# Altium PCB PCB_esp32_c3.PcbDoc
Units mm, origin at the board's own origin, x right, y up, seen from the top; angles counter-clockwise.
Board outline 73.79 x 53.97 mm, 2 copper layers (Top Layer, Bottom Layer); 50 components, 32 nets, 197 pads, 491 vias.
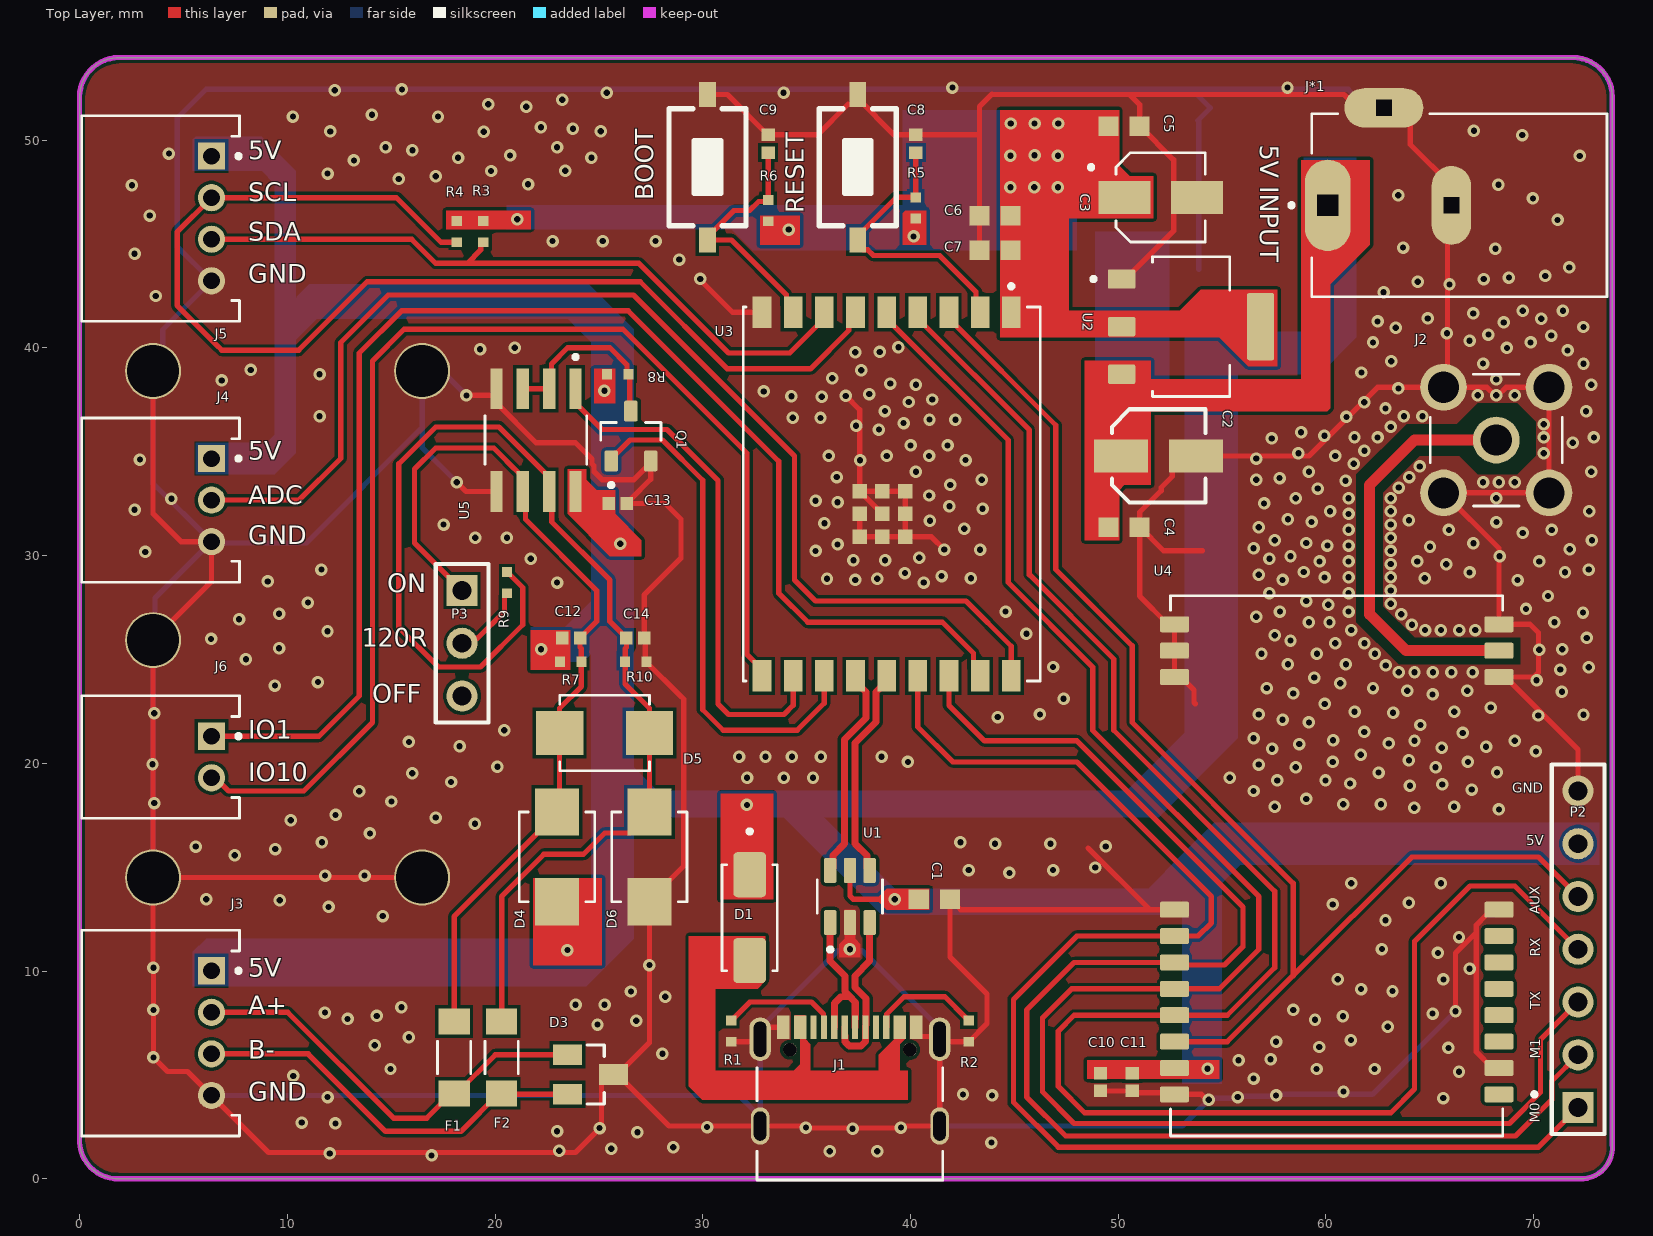
[diagram p0: Top Layer view]
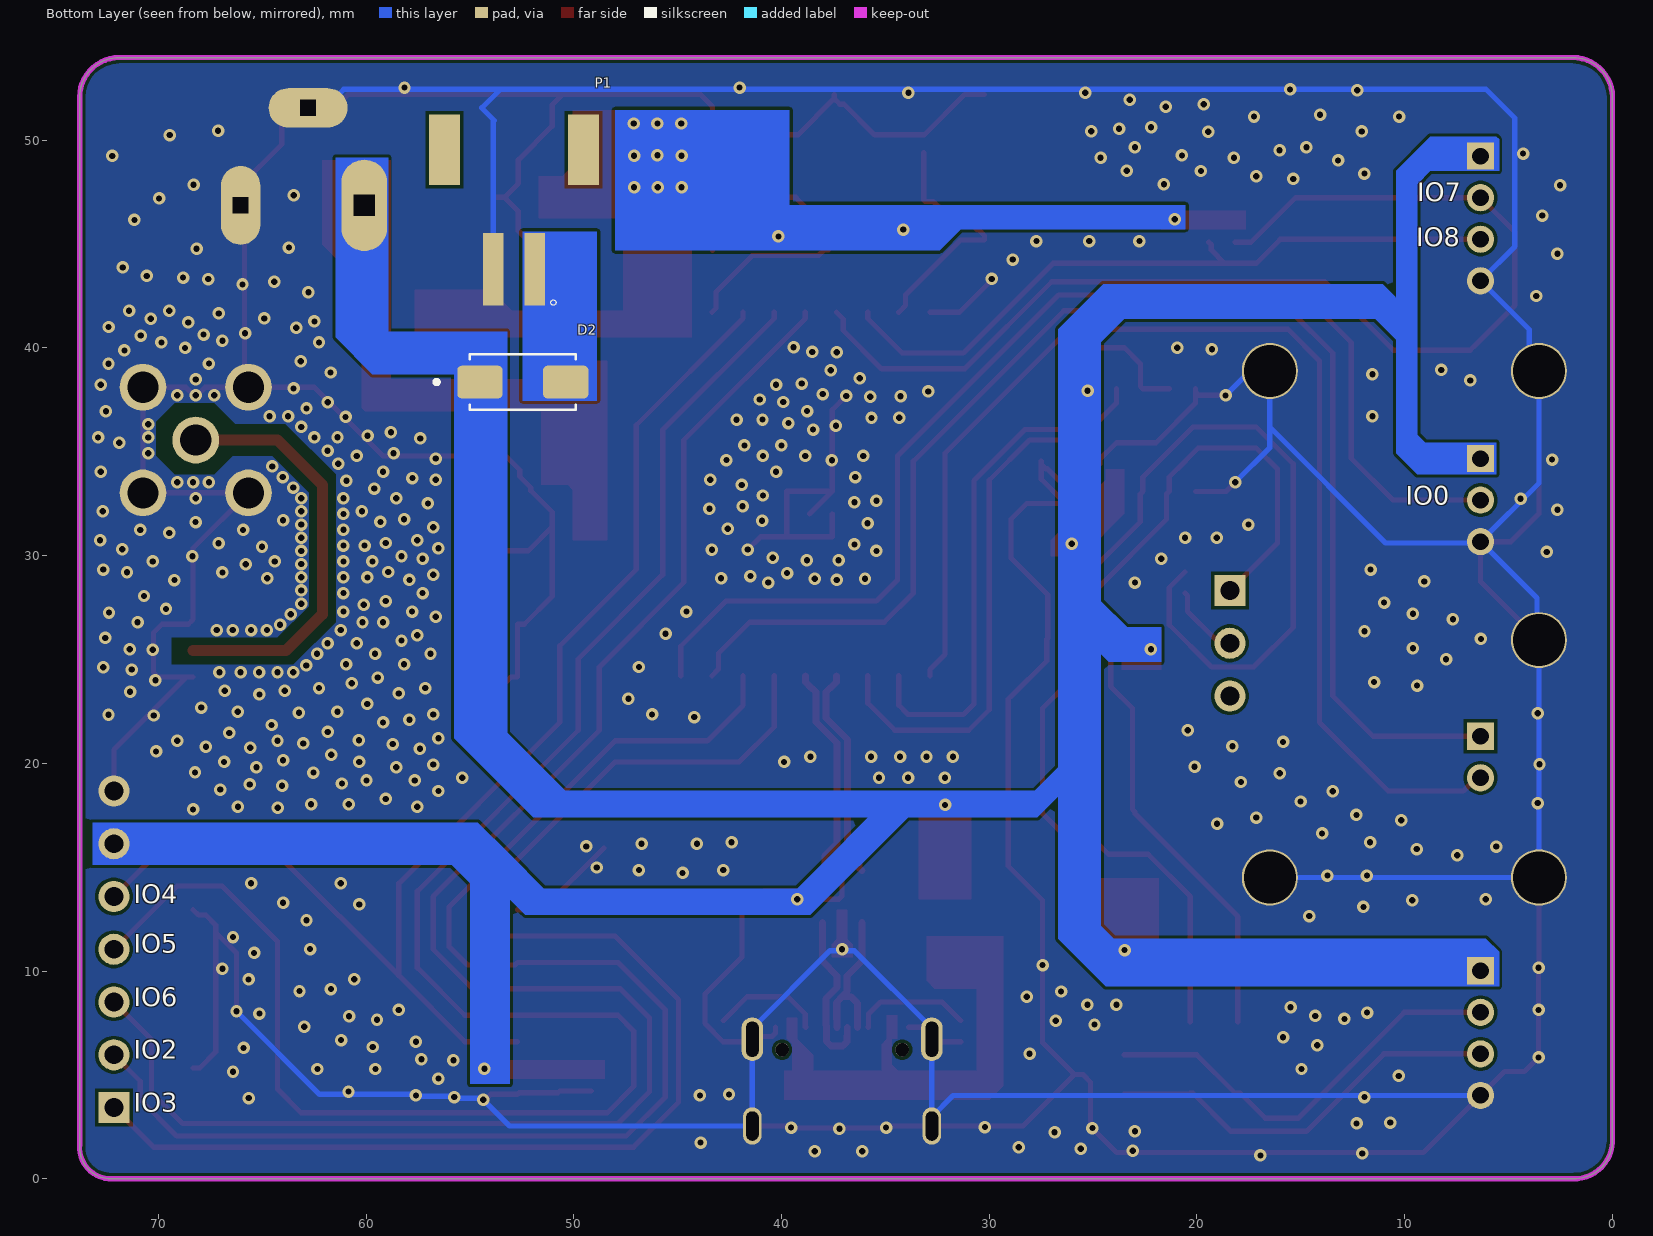
[diagram p1: Bottom Layer view, seen from below]
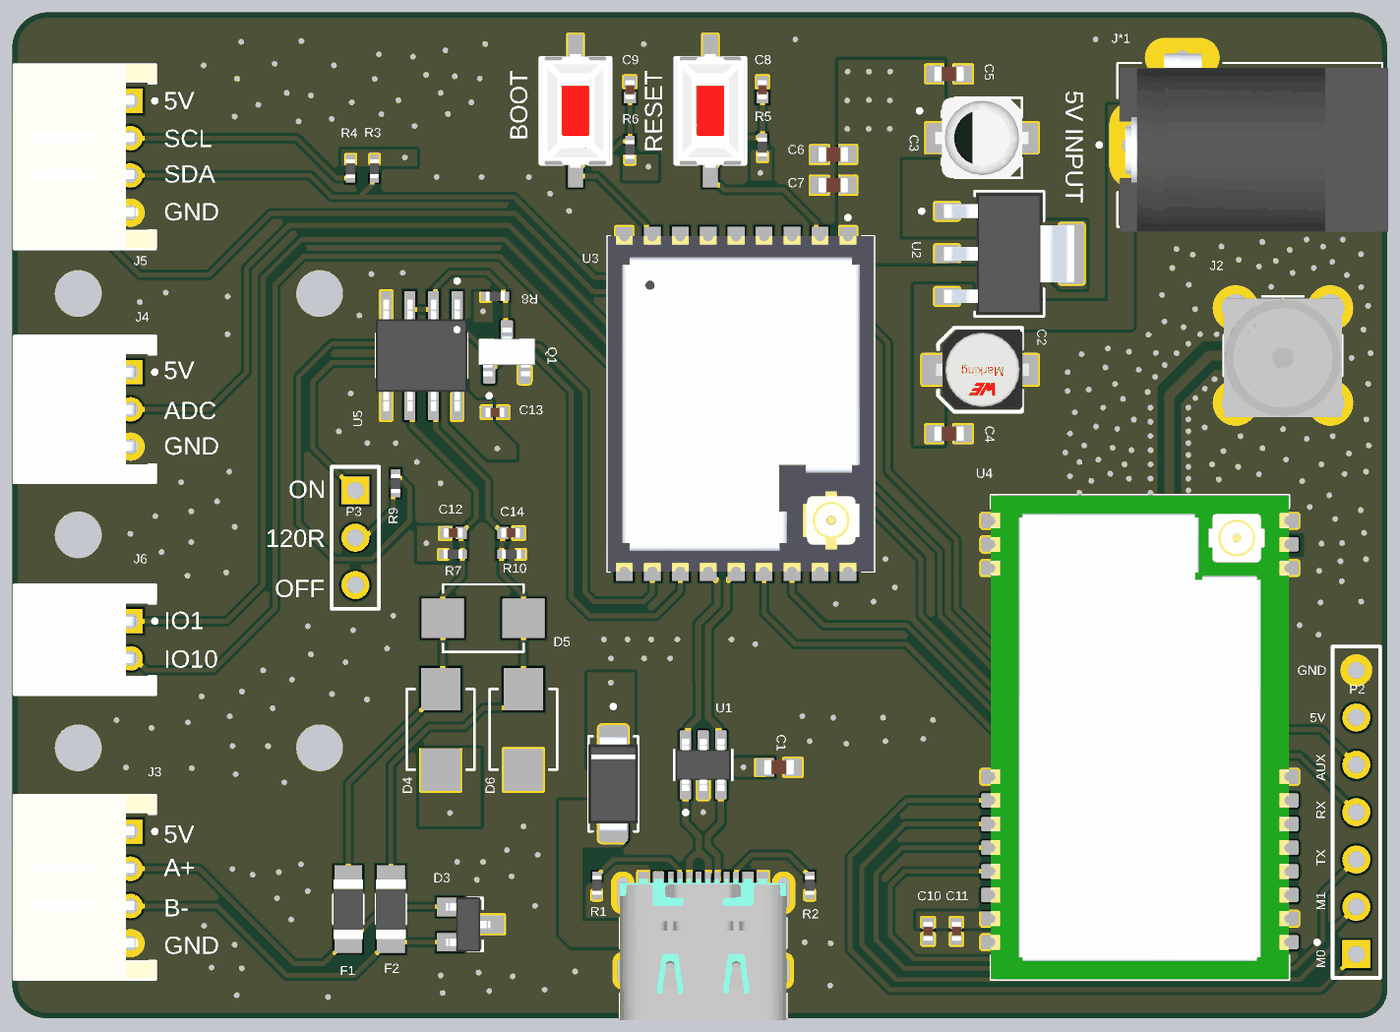
[diagram p2: 3D render of the assembled board from above, using the file's embedded part models]

## Layer stack, top to bottom
Top Solder: solder mask 0.0102, Solder Resist, Dk 3.5
Top Layer: signal copper 0.0356
Dielectric 1: dielectric 0.32, FR-4, Dk 4.8
Bottom Layer: signal copper 0.0356
Bottom Solder: solder mask 0.0102, Solder Resist, Dk 3.5

## Board outline
0,1.778 0,52.07 cw(c1.905,52.07) 1.905,53.975 71.882,53.975 cw(c71.882,52.07) 73.787,52.07 73.787,1.651 cw(c72.263,1.524) 72.39,0 1.905,0 cw(c1.841,1.842)

## Design rules (kind name [scope] priority, off if disabled: settings)
Clearance [All] p1: gap=0.154 ignorepadtopadclearanceinfootprint=FALSE
DiffPairsRouting [All] p1: maxlimit=0.16 minlimit=0.16 mostfreqgap=0.16 toplayer_minwidth=0.334 toplayer_maxwidth=0.334 toplayer_prefwidth=0.334 bottomlayer_minwidth=0.334 bottomlayer_maxwidth=0.334 bottomlayer_prefwidth=0.334 impedanceprofiledriven=TRUE impedanceprofileid={E18157C8-C9CC-4186-830D-BF8216C8B67E} impedanceprofilevalue=90.000000 maxuncoupledlength=12.7
MinimumSolderMaskSliver [All] p1: minsoldermaskwidth=0.154
PolygonConnect [All] p1: connectstyle=Direct reliefconductorwidth=0.254 reliefentries=4 polygonreliefangle="90 Angle" airgapwidth=0.254
RoutingVias [All] p1: holewidth=0.3 width=0.6 viastyle="Through Hole" minholewidth=0.3 minwidth=0.6 maxholewidth=0.3 maxwidth=0.6
SolderMaskExpansion [All] p1: expansion=0.102 istentingtop=FALSE
SupplyNets "Schematic Supply Nets_2" [InNet('3V3')] p1: voltage=0.000
SupplyNets "Schematic Supply Nets_1" [InNet('GND')] p2: voltage=0.000
SupplyNets "Schematic Supply Nets" [InNet('5V')] p3: voltage=0.000
Width ANT [InNet('ANT')] p1: maxlimit=0.535 minlimit=0.535 preferedwidth=0.535 impedanceprofiledriven=TRUE impedanceprofileid={B96C4AC9-60F8-408A-928D-AF4628141E21} impedanceprofilevalue=50.000000 minimp=50.000000 maximp=50.000000 favimp=50.000000
28 further rules are at their usual default settings.

## Classes and differential pairs
component class main: BOOT C1 C2 C3 C4 C5 C6 C7 C8 C9 D1 D2 J1 J*1 P1 R1 R2 R3 R4 R5 R6 RESET U1 U2 U3
component class LoRa: C10 C11 J2 P2 U4
component class connect: C12 C13 C14 D3 D4 D5 D6 F1 F2 J3 J4 J5 J6 P3 Q1 R7 R8 R9 R10 U5
differential pair USB: +USB_P -USB_N
differential pair D: +D_P -D_N

## Components (designator, comment, footprint, x,y, rotation, side; value= is the part's Value field where it differs from the comment)
BOOT "Nut Nhan 2 Chan SMD 3x6x2.5" PCBComponent_1 32.004,44.633 r90 top
C1 "0.1uF" CAPC1608X94N 41.148,13.462 r180 top
C2 "10uF/16V" WCAP-AS5H_4X5.5(DXL) 51.943,34.798 r180 top
C3 "EEEFN1C220R" CAP_EEEFN1C220R 52.042,47.244 r0 top
C4 "0.1uF" CAPC1608X94N 50.28,31.369 r180 top
C5 "0.1uF" CAPC1608X94N 50.28,50.673 r180 top
C6 "0.1uF" CAPC1608X94N 44.069,46.355 r0 top
C7 "10uF" CAPC1608X94N 44.069,44.704 r0 top
C8 "0.1uF" CAPC1005X61N 40.259,49.829 r270 top
C9 "0.1uF" CAPC1005X61N 33.147,49.829 r270 top
C10 "0.1uF" CAPC1005X61N 49.149,4.654 r90 top
C11 "4.7uF" CAPC1005X61N 50.673,4.654 r90 top
C12 "100pF" CAPC1005X61N 23.667,26.035 r180 top
C13 "0.1uF" CAPC1005X61N 25.908,32.512 r180 top
C14 "100pF" CAPC1005X61N 26.752,26.035 r180 top
D1 "B340A-E3/61T" DIOM5126X229N 32.258,12.573 r270 top
D2 "B340A-E3/61T" DIOM5126X229N 52.451,38.354 r180 bottom
D3 "SM712-02HTG" SOT23 24.595,5.019 r270 top
D4 "SMBJ12CA" DIOM4336X265N 22.987,15.494 r270 top
D5 "SMBJ12CA" DIOM4336X265N 25.273,21.463 r180 top
D6 "SMBJ12CA" DIOM4336X265N 27.432,15.494 r90 top
F1 "Fuse Thermal" RES_ERJU08J224V 18.034,5.842 r90 top
F2 "Fuse Thermal" RES_ERJU08J224V 20.32,5.842 r90 top
J1 "TypeC_12pin_12402012E212A" TypeC_12pin_12402012E212A 37.084,2.54 r0 top
J2 "82_SMA-50-0-41/133_NE" HUBER+SUHNER_82_SMA-50-0-41/133_NE 68.199,35.56 r0 top
J3 "S4B-PH-K-S" JST_S4B-PH-K-S 3.9,7.014 r270 top
J4 "S3B-PH-K-S" JST_S3B-PH-K-S 3.9,32.671 r270 top
J5 "S4B-PH-K-S" JST_S4B-PH-K-S 3.9,46.228 r270 top
J6 "S2B-PH-K-S" JST_S2B-PH-K-S 3.9,20.304 r270 top
J*1 "JACK_DC_2.1_EJ508A" MPD_EJ508A 62.79,46.863 r90 top
P1 "S2B-PH-SM4-TB" JST_S2B-PH-SM4-TB 52.88,43.78 r180 bottom
P2 "Header 7" HDR1X7 72.136,3.429 r90 top
P3 "Header 3" HDR1X3 18.415,28.321 r270 top
Q1 "MMBT3904" TRANS_MMBT3904 26.543,35.757 r90 top
R1 "5K1" RES_ERJU02F5102X 31.369,7.112 r90 top
R2 "5K1" RES_ERJU02F5102X 42.799,7.112 r90 top
R3 "10K" RES_ERJU02F5102X 19.431,45.597 r270 top
R4 "10K" RES_ERJU02F5102X 18.161,45.593 r270 top
R5 "10K" RES_ERJU02F5102X 40.259,46.732 r90 top
R6 "10K" RES_ERJU02F5102X 33.147,46.605 r90 top
R7 "10K" RES_ERJU02F5102X 23.644,24.892 r0 top
R8 "10K" RES_ERJU02F5102X 25.908,38.735 r0 top
R9 "120R" RES_ERJU02F5102X 20.574,28.702 r270 top
R10 "10K" RES_ERJU02F5102X 26.775,24.892 r0 top
RESET "Nut Nhan 2 Chan SMD 3x6x2.5" PCBComponent_1 39.243,44.633 r90 top
U1 "USBLC6-2SC6" USBLC6-2SC6 37.084,13.589 r90 top
U2 "AMS1117" SOT229P700X180-4N 53.51,41.021 r0 top
U3 "ESP32-C3-WROOM-02U-N4" XCVR_ESP32-C3-WROOM-02U-N4 39.101,32.964 r270 top
U4 "E32-433T20S" MODULE_E32-433T20S 60.516,15.064 r180 top
U5 "SP3485EN-L" SOIC127P599X175-8N 21.971,35.56 r270 top

## Footprints (in the part's own frame and the unit in brackets; to place one, negate y for a bottom-side part, rotate by r counter-clockwise, add the part's x,y. Pads: shape width x height; smd on the part's side, far side on the other; paste and mask are expansions set on the pad)
CAP_EEEFN1C220R [mm]
  rect 2.5x1.6 smd: 1(-1.75,0) 2(1.75,0)
  silkscreen extent -3.45,-2.15 2.15,2.15, body extent -2.5,-2.15 2.5,2.15, height 5.83
CAPC1005X61N [mm]
  rect 0.6x0.64 smd paste+0 mask+0.102: 1(-0.426,0) 2(0.426,0)
  body extent -0.51,-0.26 0.51,0.26, height 0.61
CAPC1608X94N [mm]
  rect 0.97x0.94 smd paste+0 mask+0.102: 1(-0.75,0) 2(0.75,0)
  body extent -0.8,-0.4 0.8,0.4, height 0.94
DIOM4336X265N [mm]
  rect 2.28x2.12 smd: 1(-2.165,0) 2(2.165,0)
  silkscreen extent -2.16,-1.81 2.16,1.81
DIOM5126X229N [mm]
  rrect25% 2.17x1.57 smd: A(2.065,0) C(-2.065,0)
  silkscreen extent -4.25,-1.33 2.55,1.33, body extent -2.55,-1.33 2.55,1.33, height 2.29
HDR1X3 [mm] "Connector; Header; 3 Position"
  rect 1.5x1.5 hole 0.9: 1(0,0)
  round 1.5 hole 0.9: 2(2.54,0) 3(5.08,0)
  silkscreen extent -1.27,-1.27 6.35,1.27
HDR1X7 [mm] "Connector; Header; 7 Position"
  rect 1.5x1.5 hole 0.9: 1(0,0)
  round 1.5 hole 0.9: 2(2.54,0) 3(5.08,0) 4(7.62,0) 5(10.16,0) 6(12.7,0) 7(15.24,0)
  silkscreen extent -1.27,-1.27 16.51,1.27
HUBER+SUHNER_82_SMA-50-0-41/133_NE [mm]
  round 2.25 hole 1.5: 1(0,0) G1(-2.54,2.54) G2(2.54,2.54) G3(-2.54,-2.54) G4(2.54,-2.54)
  silkscreen extent -3.17,-3.17 3.17,3.17, body extent -3.17,-3.3 3.17,3.05, height 9.6
JST_S2B-PH-K-S [mm]
  rect 1.308x1.308 / inner round 1.308 / far side rect 1.308x1.308 hole 0.8 mask+0.102: 1(-1,2.45)
  round 1.308 hole 0.8 mask+0.102: 2(1,2.45)
  silkscreen extent -2.95,-3.8 2.95,3.85, body extent -2.95,-3.79 2.95,3.81, height 4.8
JST_S2B-PH-SM4-TB [mm]
  rect 1x3.5 smd: 1(1,0) 2(-1,0)
  rect 1.5x3.4 smd: P1(3.35,5.75) P2(-3.35,5.75)
  silkscreen extent 1.77,-1.73 2.03,-1.47, body extent -3.94,-1.12 3.96,7.48, height 5.63
JST_S3B-PH-K-S [mm]
  rect 1.308x1.308 / inner round 1.308 / far side rect 1.308x1.308 hole 0.8 mask+0.102: 1(-2,2.45)
  round 1.308 hole 0.8 mask+0.102: 2(0,2.45) 3(2,2.45)
  silkscreen extent -3.95,-3.8 3.95,3.85, body extent -3.95,-3.79 3.95,3.81, height 4.8
JST_S4B-PH-K-S [mm]
  rect 1.308x1.308 / inner round 1.308 / far side rect 1.308x1.308 hole 0.8 mask+0.102: 1(-3,2.45)
  round 1.308 hole 0.8 mask+0.102: 2(-1,2.45) 3(1,2.45) 4(3,2.45)
  silkscreen extent -4.95,-3.8 4.95,3.85, body extent -4.98,-3.79 4.92,3.81, height 4.8
MODULE_E32-433T20S [mm]
  rrect25% 1.41x0.77 smd: 1(-7.81,11) 2(-7.81,9.73) 3(-7.81,8.46) 4(-7.81,7.19) 5(-7.81,5.92) 6(-7.81,4.65) 7(-7.81,3.38) 8(-7.81,2.11) 11(-7.81,-9.09) 12(-7.81,-10.36) 13(-7.81,-11.63) 14(7.81,-11.63) 15(7.81,-10.36) 16(7.81,-9.09) 19(7.81,2.11) 20(7.81,3.38) 21(7.81,4.65) 22(7.81,5.92) 23(7.81,7.19) 24(7.81,8.46) 25(7.81,9.73) 26(7.81,11)
  silkscreen extent -9.61,-13 8,13, body extent -8,-13 8,13, height 3.25
MPD_EJ508A [mm]
  oval 4.4x2.2 hole 1.02 square: 1(0,2.705)
  oval 3.8x1.9 hole 0.76 square: 2(0,-3.25)
  oval 1.9x3.8 hole 0.76 square: 3(4.69,0)
  silkscreen extent -4.4,-10.74 4.4,4.55, body extent -4.65,-11.07 4.9,3.35, height 10.83
PCBComponent_1 [mm]
  rect 1.2x0.8 smd: 1(0.564,1.778) 2(7.564,1.778)
  silkscreen extent 1.24,-0.08 6.88,3.63, body extent 1.01,-0.07 7.11,3.63, height 2.5
RES_ERJU02F5102X [mm]
  rect 0.475x0.5 smd: 1(-0.512,0) 2(0.512,0)
  body extent -0.49,-0.25 0.51,0.25, height 0.35
RES_ERJU08J224V [mm]
  rect 1.25x1.5 smd: 1(-1.725,0) 2(1.725,0)
  silkscreen extent -0.78,-0.8 0.78,0.8, body extent -1.6,-0.8 1.6,0.8, height 0.6
SOIC127P599X175-8N [mm]
  rect 1.97x0.59 smd paste+0 mask+0.102: 1(-2.47,1.905) 2(-2.47,0.635) 3(-2.47,-0.635) 4(-2.47,-1.905) 5(2.47,-1.905) 6(2.47,-0.635) 7(2.47,0.635) 8(2.47,1.905)
  silkscreen extent -4.1,-2.45 1.16,2.45, body extent -3,-2.45 3,2.45, height 1.75
SOT23 [mm]
  rect 1x1.4 smd: 1(-0.95,-1.1) 2(0.95,-1.1) 3(0,1.1)
  silkscreen extent -1.42,-0.15 1.42,0.66, body extent -1.46,-1.31 1.46,1.06, height 1.12
SOT229P700X180-4N [mm]
  rrect15% 1.31x0.93 smd: 1(-3.345,2.29) 2(-3.345,0) 3(-3.345,-2.29)
  rrect15% 1.31x3.24 smd: 2(3.345,0)
  silkscreen extent -4.8,-3.36 1.86,3.36, body extent -3.5,-3.25 3.5,3.25, height 1.8
TRANS_MMBT3904 [mm]
  rrect25% 1x0.65 smd paste+0 mask+0.102: 1(-1.2,0.95) 2(-1.2,-0.95) 3(1.2,0)
  silkscreen extent -2.46,-1.45 0.65,1.45, body extent -1.3,-1.52 1.3,1.52, height 1.3
TypeC_12pin_12402012E212A [mm]
  rect 0.6x1.14 smd: A1_B12(-3.2,4.75) A4_B9(-2.4,4.75) B1_A12(3.2,4.75) B4_A9(2.4,4.75)
  rect 0.3x1.14 smd: A5(-1.25,4.75) A6(-0.25,4.75) A7(0.25,4.75) A8(1.25,4.75) B5(1.75,4.75) B6(0.75,4.75) B7(-0.75,4.75) B8(-1.75,4.75)
  oval 1.05x2.1 hole 0.6 slot 1.7 at 90 deg: SH1(-4.32,4.18) SH2(4.32,4.18)
  oval 0.9x1.8 hole 0.6 slot 1.4 at 90 deg: SH3(-4.32,0) SH4(4.32,0)
  round 0.65 hole 0.65 unplated: ""(-2.89,3.68) ""(2.89,3.68)
  silkscreen extent -4.47,-2.6 4.47,2.81, body extent -4.47,-2.65 4.47,4.95, height 3.15
USBLC6-2SC6 [mm]
  rrect25% 1.21x0.59 smd: 1(-1.255,0.95) 2(-1.255,0) 3(-1.255,-0.95) 4(1.255,-0.95) 5(1.255,0) 6(1.255,0.95)
  silkscreen extent -2.65,-1.56 0.81,1.57, body extent -1.4,-1.46 1.4,1.46, height 1.44
WCAP-AS5H_4X5.5(DXL) [mm]
  rect 2.6x1.6 smd paste+0 mask+0.102: 1(1.8,0) 2(-1.8,0)
  silkscreen extent -2.25,-2.25 2.25,2.25, body extent -2.63,-2.15 2.37,2.15, height 5.43
XCVR_ESP32-C3-WROOM-02U-N4 [mm]
  rect 1.5x0.9 smd: 1(-8.75,5.75) 2(-8.75,4.25) 3(-8.75,2.75) 4(-8.75,1.25) 5(-8.75,-0.25) 6(-8.75,-1.75) 7(-8.75,-3.25) 8(-8.75,-4.75) 9(-8.75,-6.25) 10(8.75,-6.25) 11(8.75,-4.75) 12(8.75,-3.25) 13(8.75,-1.75) 14(8.75,-0.25) 15(8.75,1.25) 16(8.75,2.75) 17(8.75,4.25) 18(8.75,5.75)
  rect 0.7x0.7 smd: 19_1(-0.14,0.65) 19_2(0.96,0.65) 19_3(2.06,0.65) 19_4(-0.14,-0.45) 19_5(0.96,-0.45) 19_6(2.06,-0.45) 19_7(-0.14,-1.55) 19_8(0.96,-1.55) 19_9(2.06,-1.55)
  silkscreen extent -10.1,-7.15 9,7.15, body extent -9,-7.15 9,7.15, height 3.35

## Part data
C1 C4 C5 C6 C7: library part cap_0603_VJ0603D3R9DXCAP, "cap 0603 (1608 Metric)", Package="1608 Vishay Vitramon", Check_prices=https://www.snapeda.com/parts/VJ0603D3R9DXCAP/Vishay/view-part/?ref=eda, MF="Vishay Vitramon", MP=VJ0603D3R9DXCAP, SnapEDA_Link=https://www.snapeda.com/parts/VJ0603D3R9DXCAP/Vishay/view-part/?ref=snap
C2: library part CAP_10uF_25V_WCAP-AS5H_4X5.5, "CAP ALUM 10UF 20% 25V SMD", Package="Radial WÃ¼rth Elektronik", Check_prices=https://www.snapeda.com/parts/865230440002/W%25C3%25BCrth+Elektronik+Midcom/view-part/?ref=eda, MF="WÃ¼rth Elektronik", MP=865230440002, SnapEDA_Link=https://www.snapeda.com/parts/865230440002/W%25C3%25BCrth+Elektronik+Midcom/view-part/?ref=snap
C3: "CAP ALUM 22UF 20% 16V SMD", Package="RADIAL-2 Panasonic", Availability="In Stock", Check_prices=https://www.snapeda.com/parts/EEE-FN1C220R/Panasonic/view-part/6178704/?ref=eda, MF="Panasonic Electronic Components", MP=EEE-FN1C220R, Price=None, Purchase-URL=https://pricing.snapeda.com/search/part/EEE-FN1C220R/?ref=eda, SnapEDA_Link=https://www.snapeda.com/parts/EEE-FN1C220R/Panasonic/view-part/6178704/?ref=snap
C8 C9 C10 C11 C12 C13 C14: library part cap_0402_VJ0402D100MXCAP, "cap 0402", Package="1005 Vishay Vitramon", Check_prices=https://www.snapeda.com/parts/VJ0402D100MXCAP/Vishay/view-part/?ref=eda, MF="Vishay Vitramon", MP=VJ0402D100MXCAP, SnapEDA_Link=https://www.snapeda.com/parts/VJ0402D100MXCAP/Vishay/view-part/?ref=snap
D1 D2: "Diode Schottky 40 V 3A Surface Mount DO-214AC (SMA)", Package="DO-214 Vishay Semiconductor", Check_prices=https://www.snapeda.com/parts/B340A-E3/61T/Vishay/view-part/?ref=eda, MF="Vishay Semiconductor", MP=B340A-E3/61T, SnapEDA_Link=https://www.snapeda.com/parts/B340A-E3/61T/Vishay/view-part/?ref=snap
D3: "TVS Diode, SM712 Series, 31V Clamp, 600W Peak Pulse, Surface Mount, SOT23-3", Package="SOT-23 Littelfuse Inc.", Check_prices=https://www.snapeda.com/parts/SM712-02HTG/Littelfuse/view-part/?ref=eda, MF="Littelfuse Inc.", MP=SM712-02HTG, SnapEDA_Link=https://www.snapeda.com/parts/SM712-02HTG/Littelfuse/view-part/?ref=snap
D4 D5 D6: library part SMBJ10CA-13-F, Package=None, Availability=Unavailable, MF="{'manufacturer': u'Diodes Incorporated'}", MP=SMBJ10CA-13-F, Price=None
F1 F2: "Fuse, Resettable, Fast Acting, 10A, Sz 1206, 0.134x0.071x0.033\", SMT, 24VDC, PCB"
J1: "USB2.0, Type C, Top mount, CH 1.68mm, Dual Row SMT", Package=None, Availability="In Stock", Check_prices=https://www.snapeda.com/parts/12402012E212A/Amphenol/view-part/?ref=eda, MF="Amphenol ICC (Commercial Products)", MP=12402012E212A, Price=None, Purchase-URL=https://pricing.snapeda.com/search/part/12402012E212A/?ref=eda, SnapEDA_Link=https://www.snapeda.com/parts/12402012E212A/Amphenol/view-part/?ref=snap
J2: "RF Connectors / Coaxial Connectors, Straight Pcb Jack", Package=None, Check_prices=https://www.snapeda.com/parts/82_SMA-50-0-41/133_NE/Huber%252BSuhner/view-part/?ref=eda, MF=HUBER+SUHNER, MP=82_SMA-50-0-41/133_NE, SnapEDA_Link=https://www.snapeda.com/parts/82_SMA-50-0-41/133_NE/Huber%252BSuhner/view-part/?ref=snap
J3 J5: "Connector Header Through Hole, Right Angle 4 position 0.079 (2.00mm)", Package="NON STANDARD-4 J.S.T.", Check_prices=https://www.snapeda.com/parts/S4B-PH-K-S/JST/view-part/?ref=eda, MF="JST Sales", MP=S4B-PH-K-S, SnapEDA_Link=https://www.snapeda.com/parts/S4B-PH-K-S/JST/view-part/?ref=snap
J4: "Connector Header Through Hole, Right Angle 3 position 0.079 (2.00mm)", Package="NON STANDARD-3 J.S.T.", Check_prices=https://www.snapeda.com/parts/S3B-PH-K-S/JST/view-part/?ref=eda, MF="JST Sales", MP=S3B-PH-K-S, SnapEDA_Link=https://www.snapeda.com/parts/S3B-PH-K-S/JST/view-part/?ref=snap
J6: "Connector Header Through Hole, Right Angle 2 position 0.079 (2.00mm)", Package="NON STANDARD-2 J.S.T.", Check_prices=https://www.snapeda.com/parts/S2B-PH-K-S/JST/view-part/?ref=eda, MF="JST Sales", MP=S2B-PH-K-S, SnapEDA_Link=https://www.snapeda.com/parts/S2B-PH-K-S/JST/view-part/?ref=snap
J*1: "Power Barrel Connector Jack 2.10mm ID _0.083_, 5.50mm OD _0.217_ Through Hole, Right Angle / EJ508A", Package="Non-Standard MPD", Availability=Unavailable, MF=MPD, MP=EJ508A, Price=None, SnapEDA_Link=https://www.snapeda.com/parts/EJ508A/MPD%20%28Memory%20Protection%20Devices%29/view-part/474399/?ref=snap
P1: "Connector Header Surface Mount, Right Angle 2 position 0.079 (2.00mm)", Package=None, Check_prices=https://www.snapeda.com/parts/S2B-PH-SM4-TB/JST/view-part/?ref=eda, MF="JST Sales", MP=S2B-PH-SM4-TB, SnapEDA_Link=https://www.snapeda.com/parts/S2B-PH-SM4-TB/JST/view-part/?ref=snap
P2: "Header, 7-Pin", LatestRevisionDate=17-Jul-2002, LatestRevisionNote="Re-released for DXP Platform.", Publisher="Altium Limited"
P3: "Header, 3-Pin", LatestRevisionDate=17-Jul-2002, LatestRevisionNote="Re-released for DXP Platform.", Publisher="Altium Limited"
Q1: "BJT, SOT-23, 40V, 200mA, NPN, 0.35W, 150Â°C", Package="SOT-23 Diotec", Check_prices=https://www.snapeda.com/parts/MMBT3904/Diotec/view-part/?ref=eda, MF="Diotec Semiconductor", MP=MMBT3904, SnapEDA_Link=https://www.snapeda.com/parts/MMBT3904/Diotec/view-part/?ref=snap
R1 R2 R3 R4 R5 R6 R7 R8 R9 R10: library part res_0402_ERJU02F5102X, Package=None, Availability=Unavailable, MP=ERJU02F5102X, Price=None
U1: "17V Clamp 5A (8/20Âµs) Ipp Tvs Diode Surface Mount SOT-23-6", Package="SOT-23-6 STMicroelectronics", Availability="In Stock", Check_prices=https://www.snapeda.com/parts/USBLC6-2SC6/STMicroelectronics/view-part/?ref=eda, MF=STMicroelectronics, MP=USBLC6-2SC6, Price=None, Purchase-URL=https://pricing.snapeda.com/search/part/USBLC6-2SC6/?ref=eda, SnapEDA_Link=https://www.snapeda.com/parts/USBLC6-2SC6/STMicroelectronics/view-part/?ref=snap
U2: "1A LOW DROPOUT VOLTAGE REGULATOR SOT-223", Package="SOT-223 Seeed Technology", Check_prices=https://www.snapeda.com/parts/AMS1117/Advanced+Monolithic+Systems/view-part/?ref=eda, MF="Advanced Monolithic Systems", MP=AMS1117, SnapEDA_Link=https://www.snapeda.com/parts/AMS1117/Advanced+Monolithic+Systems/view-part/?ref=snap
U3: "Bluetooth, WiFi 802.11b/g/n, Bluetooth v5.0 Transceiver Module 2.4GHz Antenna Not Included, U.FL Surface Mount", Package="SMD-19 Espressif Systems", Check_prices=https://www.snapeda.com/parts/ESP32-C3-WROOM-02U-N4/Espressif+Systems/view-part/?ref=eda, MF="Espressif Systems", MP=ESP32-C3-WROOM-02U-N4, SnapEDA_Link=https://www.snapeda.com/parts/ESP32-C3-WROOM-02U-N4/Espressif+Systems/view-part/?ref=snap
U4: "Wireless serial port module (UART)", Package=Package, Availability="Not in stock", Check_prices=https://www.snapeda.com/parts/E32-433T20S/EBYTE/view-part/?ref=eda, MF=EBYTE, MP=E32-433T20S, Price=None, SnapEDA_Link=https://www.snapeda.com/parts/E32-433T20S/EBYTE/view-part/?ref=snap
U5: "1/1 Transceiver Half RS422, RS485 8-SOIC", Package=None, Check_prices=https://www.snapeda.com/parts/SP3485EN-L/MaxLinear/view-part/?ref=eda, MF="MaxLinear, Inc.", MP=SP3485EN-L, SnapEDA_Link=https://www.snapeda.com/parts/SP3485EN-L/MaxLinear/view-part/?ref=snap
BOOT RESET: Ma_Hang=MH001036, Ten="Nút Nhấn 2 Chân 3x6x2.5MM SMD"

## Free pads (board coordinates)
  round 2.7 hole 2.5 mask+0.102: 4(3.539,14.504) 4(3.539,25.934) 4(3.539,38.888) 4(16.493,14.504) 4(16.493,38.888)

## Via types
v1: diameter 0.6, hole 0.3, Top Layer to Bottom Layer, tented both sides, 491 vias

## Nets (pads, with @x,y where several pads share a name; then routed paths per layer and width w, separated by ;. In a path a pad name is that pad's centre, name@x,y a point inside that pad or via, vN(x,y) a via of type N, cw(c..) or ccw(c..) an arc to the next point about the centre after c; other vN are vias at no path point)
3V3: C3.1 C5.2 C6.2 C7.2 R3.1 R4.1 R5.1 R6.1 U2.2 U3.1
  other v1: 40.151,45.363 34.144,45.696 21.074,46.191 44.812,47.728 45.955,47.728 47.098,47.728 44.812,49.252 47.098,49.252 45.974,49.276 44.831,50.8 45.974,50.8 47.117,50.8
5V: C1.2 C2.1 C4.2 C10.2 C11.2 C12.2 C13.2 D1.C D2.C D4.2 J3.1 J4.1 J5.1 J*1.1 P2.6 R7.1 R8.1 U1.5 U2.3 U4.25 U5.8 | length 3.5
  Top Layer w0.254: U1.5 37.084,13.611 37.233,13.462 v1(39.243,13.462)
  other v1: 54.299,5.297 23.487,11.012 32.123,17.997 22.217,25.49 26.027,30.57 25.265,37.936
A+: C12.1 D4.1 D5.2 F1.2 P3.1 R7.2 U5.6 | length 43.6
  Top Layer w0.254: F1.2 18.034,12.626 22.987,17.579 D4.1 23.108,17.78 D5.2 23.108,22.65 24.156,23.698 R7.2 24.156,25.525 24.093,25.588 C12.1 24.093,26.055 24.266,26.228 24.286,26.228 24.892,26.834 24.892,28.321 21.463,31.75 21.463,32.963 U5.6 21.336,33.78 20.554,34.562 20.554,34.565 19.94,35.179 17.145,35.179 16.129,34.163 16.129,30.607 P3.1
ADC: J4.2 U3.18 | length 57.8
  Top Layer w0.254: J4.2 10.573,32.671 12.573,34.671 12.573,40.259 14.859,42.545 17.78,42.545 26.67,42.545 34.417,34.798 34.417,28.829 35.433,27.813 42.672,27.813 44.851,25.634 U3.18
ANT: J2.1 U4.12 | length 20.2
  Top Layer w0.535: J2.1 64.262,35.56 62.103,33.401 62.103,27.178 63.857,25.424 U4.12
AUX: P2.5 U3.3 U4.24 | length 62.7
  Top Layer w0.254: U3.3 41.851,41.414 46.99,36.275 46.99,29.337 50.673,25.654 50.673,21.971 58.42,14.224 58.42,9.779 ; U4.24 55.245,6.604 58.42,9.779 ; P2.5 70.231,15.494 64.135,15.494 58.42,9.779
B-: C14.2 D5.1 D6.2 F2.2 R9.1 R10.1 U5.7 | length 60.4
  Top Layer w0.254: F2.2 20.32,13.589 22.352,15.621 24.257,15.621 25.282,16.646 26.499,16.646 27.432,17.579 D6.2 27.432,20.27 27.438,20.276 D5.1 27.438,22.65 26.263,23.825 R10.1 26.263,25.525 26.326,25.588 C14.2 26.326,26.055 26.153,26.228 26.133,26.228 25.527,26.834 25.527,28.829 22.733,31.623 22.733,32.963 U5.7 22.606,33.78 20.191,36.195 17.145,36.195 15.367,34.417 15.367,26.543 17.272,24.638 19.304,24.638 21.336,26.67 21.336,28.465 20.586,29.214 R9.1
BOOT: BOOT.1 C9.2 R6.2 U3.8 | length 12
  Top Layer w0.254: C9.2 R6.2 33.078,47.048 32.697,47.048 32.258,46.609 31.496,46.609 30.557,45.67 30.499,45.67 30.226,45.397 BOOT.1 31.384,45.197 34.028,42.553 34.028,42.037 U3.8
D_N: U1.6 U3.13 | length 10.3
  Top Layer w0.334: U1.6 36.262,14.972 36.262,15.561 36.83,16.129 36.83,18.034 36.823,18.041 36.823,21.155 37.854,22.186 37.854,23.435 37.658,23.631 37.634,23.631 37.351,23.914 U3.13
D_P: U1.4 U3.14 | length 10.3
  Top Layer w0.334: U1.4 37.906,14.972 37.906,15.561 37.338,16.129 37.338,20.971 38.348,21.981 38.348,23.435 38.544,23.631 38.568,23.631 38.851,23.914 U3.14
GND: BOOT.2 C1.1 C2.2 C3.2 C4.1 C5.1 C6.1 C7.1 C8.1 C9.1 C10.1 C11.1 C13.1 C14.1 D3.3 D6.1 J1.A1_B12 J1.B1_A12 J1.SH1 J1.SH2 J1.SH3 J1.SH4 J2.G1 J2.G2 J2.G3 J2.G4 J3.4 J4.3 J5.4 J*1.2 J*1.3 P1.2 P2.7 pad.4 Q1.2 R1.1 R2.1 R10.2 RESET.2 U1.2 U2.1 U3.9 U3.19_1 U3.19_2 U3.19_3 U3.19_4 U3.19_5 U3.19_6 U3.19_7 U3.19_8 U3.19_9 U4.2 U4.8 U4.11 U4.13 U4.14 U4.15 U4.16 U4.19 U4.26 U5.4 U5.5 | length 568.9
  Top Layer w0.254: pad.4@3.539,38.888 3.539,32.021 4.889,30.671 J4.3 6.35,28.744 3.539,25.934 pad.4@3.539,14.504 ; pad.4@16.493,14.504 pad.4@3.539,14.504 ; v1(18.161,33.528) 18.599,33.09 U5.5 ; v1(18.625,37.713) 19.898,37.713 U5.4@20.066,37.881 ; U5.4 U5.4@20.066,37.881 ; Q1.2 Q1.2@27.493,34.382 ; v1@29.856,43.296 31.438,41.714 U3.9 ; BOOT.2 31.185,52.197 33.127,50.255 C9.1 35.523,50.255 36.992,51.724 37.192,51.724 RESET.2@37.465,51.997 ; R1.1 32.644,6.6 J1.SH1 32.764,6.922 33.132,7.29 J1.A1_B12 ; v1(36.887,37.686) 37.551,37.022 U3.19_7 ; RESET.2 RESET.2@37.465,51.997 ; U3.19_8 U3.19_9 U3.19_6 U3.19_3 ; U3.19_5 U3.19_7 ; J1.B1_A12 40.284,7.02 40.457,6.847 41.277,6.847 J1.SH2 ; v1(41.625,30.289) 41.01,30.904 U3.19_3 ; C7.1 C6.1 43.319,50.165 ; 48.548,15.929 51.523,12.954 ; C10.1 C11.1 50.755,4.146 52.624,4.146 U4.26 54.008,4.064 54.262,3.81 v1(54.356,3.81) ; U2.1 50.355,43.311 52.669,45.625 52.669,46.571 C3.2@53.342,47.244 ; U4.19 51.523,12.954 ; 53.713,22.869 53.646,22.936 53.646,23.534 53.026,24.154 U4.16 U4.15 U4.14 52.386,26.694 51.03,28.05 C4.1 ; C3.2 C3.2@53.342,47.244 ; 54.046,30.232 52.182,30.232 51.045,31.369 C4.1 ; v1(66.235,8.065) 66.235,10.863 67.24,11.868 ; U4.2 68.006,5.334 67.24,6.1 67.24,11.868 ; U4.8 68.068,12.696 67.715,12.696 67.24,12.221 67.24,11.868 ; U4.11 U4.11@68.646,24.154 ; P2.7 72.136,20.664 U4.11@68.646,24.154 ; pad.4@3.539,14.504 3.539,10.16 3.556,10.143 v1(3.556,8.128) v1(3.556,5.842) 4.231,5.167 5.197,5.167 J3.4 9.094,1.27 23.876,1.27 25.122,2.516 25.122,4.646 25.495,5.019 D3.3 D3.3@25.895,5.019 ; U5.4@20.066,37.881 20.066,37.34 21.973,35.433 23.876,35.433 24.665,34.644 24.665,34.421 24.765,34.321 24.765,34.041 25.151,33.655 26.685,33.655 27.214,34.184 27.295,34.184 Q1.2@27.493,34.382 ; D3.3@25.895,5.019 27.432,6.556 v1(27.432,10.287) D6.1 27.432,13.409 29.083,15.06 29.083,23.092 28.934,23.241 28.926,23.241 27.233,24.934 27.233,25.98 C14.1 27.178,28.1 28.956,29.878 28.956,31.75 28.194,32.512 C13.1 26.334,32.532 26.507,32.705 26.522,32.705 27.493,33.676 Q1.2@27.493,34.382 ; D3.3@25.895,5.019 28.374,2.54 J1.SH3 34.965,2.54 35.064,2.441 37.183,2.441 v1(37.211,2.413) 37.239,2.441 39.438,2.441 39.537,2.54 J1.SH4 J1.SH2 ; RESET.2@37.465,51.997 39.207,50.255 C8.1 43.229,50.255 43.319,50.165 ; U3.19_7 U3.19_4 U3.19_1 U3.19_2 U3.19_3 ; J1.SH2 41.524,6.6 R2.1 42.811,6.6 43.688,7.477 43.688,8.89 41.898,10.68 C1.1 41.913,13.462 42.421,12.954 51.523,12.954 ; 43.319,50.165 43.319,51.618 43.92,52.219 43.942,52.197 50.546,52.197 ; 50.546,52.197 60.868,52.197 61.512,51.553 63.295,51.553 64.055,50.793 64.055,49.798 66.04,47.813 J*1.2 65.849,46.673 65.849,38.291 J2.G1 ; 50.546,52.197 51.03,51.713 C5.1 51.045,50.673 52.669,49.049 52.669,47.917 C3.2@53.342,47.244 ; C4.1 51.03,32.085 52.07,33.125 52.07,33.274 52.603,33.807 52.603,34.125 53.276,34.798 59.182,34.798 62.484,38.1 63.488,38.1 J2.G1 ; J2.G1 67.751,38.1 68.132,37.719 68.293,37.719 68.674,38.1 J2.G2 J2.G4 J2.G3 68.326,30.353 68.326,26.924 68.556,26.694 69.826,26.694 70.231,26.289 70.231,24.384 70.001,24.154 U4.11@68.646,24.154
  Bottom Layer w0.254: J3.4 31.74,4.014 J1.SH3@32.764,2.99 ; pad.4@16.493,14.504 3.539,14.504 3.539,25.934 3.629,26.023 3.629,27.95 J4.3 ; v1(18.161,33.528) 16.493,35.196 16.493,36.178 ; v1(18.625,37.713) 17.45,38.888 16.493,38.888 16.493,36.178 ; J1.SH3 J1.SH3@32.764,2.99 ; v1(41.625,30.289) v1@41.681,30.232 ; P1.2 53.88,50.895 53.826,50.949 54.43,51.553 53.532,52.451 ; J*1.3 61.964,51.553 61.066,52.451 53.532,52.451 ; v1(66.235,8.065) 62.234,4.064 57.597,4.064 57.508,3.974 55.79,3.974 55.689,3.873 54.419,3.873 53.086,2.54 J1.SH4 J1.SH2 41.404,7.245 37.666,10.983 37.15,10.983 v1(37.084,11.049) 37.018,10.983 36.502,10.983 32.764,7.245 J1.SH1 J1.SH3@32.764,2.99 ; J4.3 3.539,33.482 3.539,38.888 4.007,39.356 4.007,40.885 J5.4 4.699,44.879 4.699,51.054 6.096,52.451 53.532,52.451 ; J4.3 6.414,30.607 10.922,30.607 16.493,36.178
  other v1: 16.946,1.126 12.048,1.221 36.108,1.326 38.394,1.326 23.097,1.348 25.594,1.448 28.575,1.524 43.895,1.742 26.858,2.24 22.987,2.286 25.035,2.445 34.965,2.469 39.537,2.469 30.209,2.491 12.319,2.667 10.7,2.709 65.642,3.888 11.938,3.937 55.753,3.937 43.925,4.015 57.597,4.012 42.528,4.061 60.844,4.197 56.515,4.826 10.287,4.953 66.404,5.158 14.969,5.285 59.546,5.285 62.34,5.285 55.794,5.713 57.334,5.754 28.06,6.023 65.896,6.301 59.671,6.346 14.207,6.428 57.597,6.598 61.2,6.68 15.858,6.809 62.975,7.317 24.932,7.422 26.799,7.606 59.471,7.654 12.9,7.694 60.816,7.825 14.307,7.841 65.134,7.952 11.811,8.001 58.42,8.128 15.494,8.255 23.876,8.382 25.273,8.382 28.194,8.763 26.543,9.017 63.203,9.037 61.688,9.132 60.562,9.603 65.653,9.6 66.912,10.111 3.556,10.16 65.388,10.873 62.691,11.059 66.404,11.635 62.865,12.446 14.6,12.65 11.99,13.09 60.325,13.208 63.991,13.286 9.635,13.413 6.102,13.454 61.214,14.224 65.532,14.224 11.817,14.597 13.722,14.597 44.762,14.726 42.799,14.859 46.863,14.859 48.895,14.986 7.476,15.572 9.425,15.873 5.594,15.994 49.403,16.002 44.069,16.129 46.736,16.129 11.668,16.198 42.401,16.205 13.976,16.629 19.033,17.096 10.166,17.264 17.151,17.391 12.325,17.518 68.326,17.78 64.245,17.858 57.531,17.907 66.167,17.907 60.833,18.034 62.644,18.036 3.596,18.09 15.011,18.163 59.055,18.288 13.468,18.661 56.515,18.669 67.02,18.739 64.041,18.925 65.594,18.984 61.161,19.029 17.885,19.101 57.658,19.177 59.977,19.179 32.131,19.304 33.909,19.304 35.306,19.304 55.372,19.304 16.02,19.527 62.533,19.557 68.232,19.56 58.547,19.812 65.278,19.812 20.113,19.834 56.769,19.939 3.511,19.954 39.878,20.066 60.325,20.066 66.835,20.068 63.991,20.144 31.75,20.32 33.02,20.32 34.29,20.32 35.687,20.32 38.608,20.32 61.673,20.414 70.104,20.574 57.404,20.701 65.568,20.745 67.706,20.798 18.294,20.82 58.708,20.93 63.025,20.957 15.858,21.033 64.262,21.082 69.088,21.082 60.342,21.115 56.515,21.209 66.581,21.465 61.847,21.51 20.447,21.59 64.549,21.846 59.182,21.971 57.912,22.098 44.196,22.225 70.214,22.303 46.228,22.352 56.769,22.352 72.396,22.344 3.596,22.408 63.229,22.43 61.374,22.481 66.175,22.487 67.928,22.684 59.944,22.86 47.371,23.114 65.134,23.319 58.42,23.368 71.357,23.446 63.914,23.497 66.802,23.495 57.15,23.622 62.263,23.624 9.404,23.741 60.685,23.859 11.478,23.913 70.137,24.005 59.436,24.13 63.5,24.384 64.262,24.384 65.151,24.384 66.04,24.384 67.056,24.384 71.28,24.513 46.863,24.638 72.65,24.63 62.872,24.714 58.166,24.765 60.96,24.765 8.007,25.011 56.896,25.273 59.563,25.273 62.357,25.273 70.264,25.465 71.375,25.496 9.603,25.545 60.452,25.781 61.849,25.781 58.293,25.908 6.333,25.986 72.55,26.037 57.531,26.162 45.58,26.238 11.936,26.359 61.214,26.416 64.77,26.416 65.532,26.416 66.421,26.416 67.183,26.416 64.135,26.67 59.182,26.797 60.171,26.786 70.999,26.789 7.678,26.937 56.642,27.051 63.627,27.178 9.605,27.199 72.373,27.256 44.577,27.305 57.785,27.305 61.087,27.305 69.629,27.434 60.106,27.636 63.119,27.686 10.995,27.736 59.055,27.813 70.688,28.056 57.277,28.194 61.087,28.194 63.119,28.321 22.987,28.702 40.64,28.702 9.057,28.758 37.338,28.829 57.912,28.829 69.226,28.822 35.981,28.885 38.394,28.885 42.909,28.907 64.753,28.907 59.93,28.95 61.087,28.956 63.119,28.956 41.496,29.012 56.769,29.083 39.734,29.161 66.914,29.191 58.928,29.21 71.507,29.202 11.643,29.326 72.65,29.329 63.119,29.591 65.792,29.583 59.69,29.718 61.087,29.718 64.389,29.718 70.266,29.719 37.251,29.774 38.775,29.774 21.717,29.845 57.277,29.845 40.426,29.901 58.293,29.972 68.359,29.974 3.158,30.177 35.433,30.226 63.119,30.226 43.347,30.282 71.738,30.304 56.515,30.353 65.007,30.431 60.071,30.48 61.087,30.48 36.489,30.536 67.099,30.59 59.055,30.607 57.531,30.734 72.804,30.736 19.05,30.861 20.574,30.861 63.119,30.861 69.474,31.091 61.087,31.242 65.919,31.234 70.872,31.234 42.585,31.298 56.769,31.369 17.526,31.496 63.119,31.496 35.854,31.552 59.309,31.623 68.205,31.615 40.934,31.679 63.991,31.701 58.166,31.75 61.087,32.004 60.198,32.131 63.119,32.131 72.677,32.133 2.65,32.209 43.469,32.26 41.875,32.37 57.023,32.512 36.489,32.568 35.433,32.639 4.42,32.742 58.547,32.766 61.087,32.766 63.119,32.766 68.199,32.766 40.894,32.893 59.603,33.229 63.5,33.274 41.91,33.401 67.564,33.528 68.326,33.528 69.088,33.528 60.943,33.606 43.434,33.655 56.642,33.655 57.768,33.733 36.449,33.782 64.008,33.782 40.259,34.036 59.182,34.036 72.771,34.036 64.516,34.29 61.341,34.417 37.572,34.591 42.654,34.599 2.904,34.622 56.642,34.671 36.068,34.798 38.862,34.798 40.894,34.798 60.452,34.798 58.674,34.925 70.485,34.925 61.849,35.052 40.005,35.306 41.783,35.306 71.882,35.433 57.387,35.638 61.373,35.699 62.484,35.687 70.485,35.687 72.898,35.687 59.927,35.765 58.801,35.941 38.481,36.068 63.119,36.195 37.378,36.251 70.485,36.322 39.664,36.378 42.165,36.537 40.914,36.545 34.33,36.632 35.668,36.628 60.983,36.678 11.557,36.703 63.754,36.703 64.643,36.703 38.772,36.957 72.523,36.949 62.865,37.084 39.918,37.394 61.844,37.383 41.051,37.514 35.727,37.648 34.267,37.671 67.31,37.719 68.199,37.719 69.088,37.719 38.013,37.775 32.933,37.902 63.488,38.049 40.259,38.227 72.771,38.227 39.029,38.283 6.841,38.432 68.199,38.481 36.235,38.537 11.557,38.735 61.705,38.813 37.632,38.918 8.238,38.94 67.564,39.243 72.396,39.235 63.141,39.358 37.336,39.793 38.521,39.807 71.628,39.878 19.279,39.938 20.955,40.005 68.713,39.997 39.419,40.025 62.263,40.261 69.85,40.259 66.912,40.337 70.849,40.591 67.818,40.64 65.823,40.699 63.356,40.972 72.391,41.005 68.563,41.226 62.484,41.275 70.358,41.402 64.898,41.42 67.089,41.658 69.469,41.783 71.407,41.785 3.666,42.496 62.771,42.674 65.946,43.055 64.422,43.182 29.878,43.319 67.597,43.309 68.807,43.381 70.559,43.463 71.709,43.874 28.869,44.252 2.65,44.528 68.156,44.766 63.714,44.825 22.773,45.141 25.186,45.141 27.726,45.141 71.147,46.158 3.384,46.366 69.96,47.195 63.477,47.343 2.523,47.83 68.304,47.846 21.59,47.879 15.367,48.133 17.145,48.26 11.938,48.387 19.812,48.514 23.375,48.528 13.208,49.022 18.222,49.15 24.638,49.149 72.214,49.238 20.723,49.264 4.301,49.354 16.024,49.518 14.732,49.657 22.987,49.657 69.452,50.243 12.065,50.419 19.453,50.407 25.093,50.423 67.119,50.453 23.749,50.546 22.208,50.624 10.27,51.132 17.255,51.132 14.075,51.223 21.506,51.602 19.673,51.726 23.241,51.943 25.383,52.275 33.892,52.275 12.286,52.395 15.516,52.439 42.02,52.529 58.149,52.529
IO1: J6.1 U3.17 | length 66.6
  Top Layer w0.254: J6.1 11.525,21.304 13.462,23.241 13.462,39.751 15.494,41.783 26.416,41.783 33.655,34.544 33.655,28.194 35.052,26.797 41.529,26.797 43.028,25.298 43.028,24.537 U3.17
IO10: J6.2 U3.10 | length 58.9
  Top Layer w0.254: J6.2 6.544,19.304 7.179,18.669 10.795,18.669 14.097,21.971 14.097,39.37 15.621,40.894 26.162,40.894 32.131,34.925 32.131,25.234 32.851,24.514 U3.10
M0: P2.1 U3.15 U4.20 | length 66.1
  Top Layer w0.254: U3.15 40.351,21.752 42.037,20.066 48.006,20.066 54.483,13.589 54.483,12.319 53.848,11.684 U4.20 48.006,11.684 44.958,8.636 44.958,3.683 47.117,1.524 70.231,1.524 P2.1
M1: P2.2 U3.16 U4.21 | length 66.9
  Top Layer w0.254: U3.16 41.851,22.792 43.561,21.082 48.006,21.082 56.007,13.081 56.007,11.176 55.118,10.287 52.833,10.287 U4.21 47.879,10.414 45.593,8.128 45.593,3.937 47.471,2.059 69.115,2.059 70.866,3.81 70.866,4.699 P2.2
NetD1_A: D1.A J1.A4_B9 J1.B4_A9 | length 11.6
  Top Layer w0.254: J1.A4_B9 34.8,7.174 34.8,5.463 33.887,4.55 33.887,4.34 34.036,4.191 38.604,4.191 39.368,4.955 39.368,7.174 J1.B4_A9
NetD2_A: D2.A P1.1
NetD3_1: D3.1 F1.1 J3.2 | length 20.5
  Top Layer w0.254: J3.2 10.02,8.014 15.113,2.921 16.713,2.921 17.909,4.117 F1.1 18.159,4.117 20.011,5.969 D3.1
NetD3_2: D3.2 F2.1 J3.3 | length 19.5
  Top Layer w0.254: J3.3 11.004,6.014 14.732,2.286 18.364,2.286 20.195,4.117 F2.1 20.368,4.069 D3.2
NetJ1_A5: J1.A5 R1.2 | length 5.7
  Top Layer w0.254: R1.2 31.381,7.624 32.266,8.509 35.232,8.509 35.811,7.93 35.811,7.313 J1.A5
NetJ1_B5: J1.B5 R2.2 | length 5.4
  Top Layer w0.254: J1.B5 38.857,7.313 38.857,7.93 39.69,8.763 41.66,8.763 42.676,7.747 42.676,7.735 42.787,7.624 R2.2
NetP3_2: P3.2 R9.2 | length 3.6
  Top Layer w0.254: P3.2 18.653,26.019 19.161,26.019 20.451,27.309 20.451,28.08 20.562,28.19 R9.2
NetQ1_3: Q1.3 R8.2 U5.2 U5.3 | length 9.1
  Top Layer w0.254: U5.3 U5.2 22.718,38.142 22.718,39.228 23.495,40.005 25.527,40.005 26.349,39.183 26.349,38.806 26.482,38.674 26.482,37.019 Q1.3
RESET: C8.2 R5.2 RESET.1 U3.2 | length 13.8
  Top Layer w0.254: C8.2 R5.2 39.312,47.244 37.465,45.397 RESET.1 37.465,44.997 37.738,44.724 37.938,44.724 38.212,44.45 41.402,44.45 43.156,42.696 43.156,41.909 U3.2
SCL: J5.2 R4.2 U3.6 | length 56.7
  Top Layer w0.254: R4.2 17.403,45.081 15.256,47.228 J5.2 4.699,45.577 4.699,42.037 6.592,40.144 6.846,39.89 10.553,39.89 13.843,43.18 26.993,43.18 31.184,38.989 35.179,38.989 37.028,40.838 37.028,41.391 U3.6
SDA: J5.3 R3.2 U3.7 | length 34.1
  Top Layer w0.254: J5.3 15.986,45.228 17.145,44.069 18.669,44.069 ; R3.2 19.419,45.085 19.308,44.975 19.308,44.708 18.669,44.069 ; U3.7 35.851,41.414 34.188,39.751 31.242,39.751 26.924,44.069 18.669,44.069
UART1_RX: U3.11 U5.1 | length 25.3
  Top Layer w0.254: U5.1 23.876,37.34 24.13,37.086 24.13,37.084 25.145,36.069 28.278,36.069 30.734,33.613 30.734,22.86 31.242,22.352 33.909,22.352 34.351,22.794 U3.11
UART1_TX: Q1.1 U3.12 | length 24.9
  Top Layer w0.254: Q1.1 25.593,34.732 25.791,34.93 25.872,34.93 26.502,35.56 28.067,35.56 29.999,33.628 29.999,22.579 30.988,21.59 34.544,21.59 35.851,22.897 U3.12
UART2_RX: P2.4 U3.4 U4.23 | length 88.5
  Top Layer w0.254: U3.4 40.351,41.414 45.72,36.045 45.72,29.083 49.784,25.019 49.784,21.59 57.531,13.843 57.531,10.16 55.245,7.874 U4.23 47.879,7.874 47.117,7.112 47.117,4.445 48.387,3.175 63.119,3.175 64.262,4.318 64.262,11.43 66.929,14.097 69.088,14.097 P2.4
UART2_TX: P2.3 U3.5 U4.22 | length 83.7
  Top Layer w0.254: U3.5 38.851,41.414 44.704,35.561 44.704,28.702 48.768,24.638 48.768,21.59 56.769,13.589 56.769,11.049 54.864,9.144 U4.22 47.752,9.144 46.355,7.747 46.355,4.191 47.879,2.667 68.834,2.667 70.331,4.164 70.331,6.704 P2.3
USB_N: J1.A7 J1.B7 U1.1 | length 8.4
  Top Layer w0.334: U1.1 36.134,10.475 36.837,9.772 36.837,9.01 37.084,8.763 ; J1.B7 36.334,8.452 36.645,8.763 37.084,8.763 ; J1.A7 37.334,7.693 37.334,8.513 ; J1.A7@37.351,7.693 37.351,7.727 37.363,7.739 37.363,8.484 37.334,8.513 ; 37.084,8.763 37.334,8.513
USB_P: J1.A6 J1.B6 U1.3 | length 8.1
  Top Layer w0.334: J1.A6@36.834,6.887 J1.A6 ; J1.A6@36.851,6.887 36.851,6.599 37.051,6.399 37.617,6.399 37.828,6.61 37.828,7.386 37.857,7.415 37.857,8.689 37.331,9.215 37.331,9.772 38.034,10.475 U1.3
pads on no net: J1. J1.A8 J1.B8 P1.P1 P1.P2 P3.3 U4.1 U4.3 U4.4 U4.5 U4.6 U4.7

## Polygon pours and split planes (outlines as drawn)
GND on Bottom Layer "GND_L02_P000" (solid, remove dead copper, pour order 0): -0.254,53.975 73.787,53.975 73.787,0 0,0 0,2.286 -0.254,2.54
GND on Top Layer "GND_L01_P001" (solid, pour order 1): -0.127,53.975 73.787,53.975 73.787,0 0,0 0,2.667 -0.127,2.794

## Keep-outs
Keep-Out Layer:
  the board outline again, w0.254

## Other copper
Top Layer:
  pour cut-out: 70.104,36.449 69.215,37.338 67.31,37.338 66.294,36.322 63.881,36.322 61.468,33.909 61.468,26.797 63.5,24.765 69.342,24.765 69.342,26.035 64.262,26.035 62.738,27.559 62.738,33.02 64.516,34.798 66.421,34.798 67.31,33.909 69.215,33.909 70.104,34.798
  region net 5V: 40.894,13.97 38.862,13.97 38.481,13.589 38.481,13.335 38.862,12.954 40.894,12.954
  region net 5V: 48.514,5.715 48.514,4.826 54.864,4.826 54.864,5.715
  region net 5V: 48.387,30.734 50.038,30.734 50.038,33.147 50.292,33.401 51.562,33.401 51.562,39.37 48.387,39.37
  region net 5V: 58.801,49.022 58.801,38.481 50.038,38.481 50.038,36.957 60.071,36.957 60.198,37.084 60.198,43.053 62.103,44.958 62.103,49.022
  region net 5V: 23.622,26.416 21.717,26.416 21.717,24.511 23.622,24.511
  region net 5V: 21.844,14.478 21.844,10.287 25.146,10.287 25.146,14.478
  region net 5V: 30.861,13.462 30.861,18.542 33.401,18.542 33.401,13.462
  region net 5V: 23.495,34.163 23.495,32.004 25.527,29.972 27.051,29.972 27.051,30.734 25.781,32.004 25.781,33.147 24.892,33.147 24.384,33.655 24.384,34.163
  region net 5V: 24.765,38.989 24.765,37.338 25.781,37.338 25.781,38.989
  region net GND: 36.83,12.954 36.83,11.557 36.576,11.303 36.576,10.668 37.592,10.668 37.592,11.303 37.338,11.557 37.338,12.954
  region net 3V3: 17.653,46.609 21.717,46.609 21.717,45.72 17.653,45.72
  region net NetD1_A: 39.243,7.747 39.243,6.731 38.481,5.969 38.481,4.445 39.37,4.445 39.624,4.699 39.368,4.955 39.368,6.348 39.751,6.731 39.751,7.747
  region net NetD1_A: 34.417,7.874 34.417,6.731 34.671,6.731 34.8,6.602 34.8,5.463 34.344,5.007 34.397,4.953 35.179,4.953 35.179,6.477 34.925,6.731 34.925,7.874
  region net NetD1_A: 33.02,11.684 29.337,11.684 29.337,4.445 29.972,3.81 39.878,3.81 39.878,5.207 30.607,5.207 30.607,9.144 32.639,9.144 33.02,9.525
  region net 3V3: 46.736,41.783 46.736,40.513 54.864,40.513 56.261,39.116 57.658,39.116 57.658,42.799 53.975,42.799 52.959,41.783
  region net 3V3: 50.038,51.435 50.038,48.768 50.546,48.26 51.689,48.26 51.689,46.228 46.355,46.228 46.355,51.435
  region net 3V3: 32.766,46.355 32.766,44.958 34.671,44.958 34.671,46.355
  region net 3V3: 39.751,46.609 39.624,46.482 39.624,44.958 40.767,44.958 40.767,46.609
  region net 3V3: 44.323,51.435 44.323,40.513 47.625,40.513 47.625,51.435
Bottom Layer:
  pour cut-out: 70.104,36.449 69.215,37.338 67.31,37.338 66.294,36.322 63.881,36.322 61.468,33.909 61.468,26.797 63.5,24.765 69.342,24.765 69.342,26.035 64.262,26.035 62.738,27.559 62.738,33.02 64.516,34.798 66.421,34.798 67.31,33.909 69.215,33.909 70.104,34.798
  region net 5V: 5.461,10.922 6.096,11.557 24.003,11.557 24.003,9.652 23.622,9.271 5.461,9.271
  region net 5V: 58.928,49.149 58.928,40.767 53.213,40.767 53.213,33.528 55.753,33.528 55.753,38.735 59.69,38.735 61.468,40.513 61.468,49.149
  region net 5V: 5.461,50.038 5.588,50.165 8.763,50.165 10.414,48.514 10.414,34.925 9.398,33.909 5.588,33.909 5.588,35.433 9.017,35.433 9.398,35.814 9.398,47.879 8.763,48.514 5.461,48.514
  region net 5V: 9.398,41.846 9.842,41.846 11.049,43.053 24.511,43.053 26.67,40.894 26.67,27.305 24.257,24.892 21.717,24.892 21.717,26.543 23.368,26.543 24.638,27.813 24.638,40.259 23.495,41.402 11.43,41.402 10.287,40.259 9.398,40.259
  region net 5V: 54.61,17.145 53.086,15.621 53.086,4.572 54.991,4.572 54.991,14.224 55.88,15.113 73.152,15.113 73.152,17.145
  region net 5V: 38.608,13.97 51.435,13.97 53.086,15.621 54.61,15.621 54.61,13.462 53.086,13.462 52.324,12.7 38.608,12.7 38.608,13.843
  region net 5V: 38.608,12.7 33.909,17.399 27.686,17.399 26.67,18.415 24.638,18.415 24.638,19.812 26.67,19.812 27.813,18.669 34.544,18.669 39.243,13.97 40.259,13.97 40.259,12.7 39.243,12.7
  region net 5V: 24.638,27.813 24.638,12.192 24.003,11.557 21.082,11.557 21.082,9.271 24.384,9.271 26.67,11.557 26.67,27.813 24.892,27.813
  region net 5V: 53.213,34.544 53.213,21.463 50.419,18.669 33.655,18.669 33.655,17.399 51.943,17.399 55.753,21.209 55.753,34.544
  region net 3V3: 39.624,51.435 39.624,44.704 48.006,44.704 48.006,51.435
  region net 3V3: 20.574,45.72 31.369,45.72 32.385,44.704 41.021,44.704 41.021,45.974 40.132,46.863 20.574,46.863
  region net NetD2_A: 48.895,45.593 48.895,37.465 52.451,37.465 52.451,45.593

## Silkscreen, mask and mechanical layers (free items; w line width, h text height)
Top Overlay:
  text "5V INPUT" at 56.532,49.784 h1.52 r270
  text "5V" at 8.128,48.771 h1.52
  text "SCL" at 8.128,46.753 h1.52
  text "SDA" at 8.128,44.848 h1.52
  text "GND" at 8.128,42.816 h1.52
  text "5V" at 8.128,34.307 h1.52
  text "ADC" at 8.128,32.148 h1.52
  text "GND" at 8.128,30.243 h1.52
  text "ON" at 14.814,27.916 h1.52
  text "120R" at 13.589,25.29 h1.52
  text "OFF" at 14.082,22.601 h1.52
  text "IO1" at 8.128,20.88 h1.52
  text "IO10" at 8.128,18.813 h1.52
  text "GND" at 68.967,18.424 h0.8
  text "5V" at 69.64,15.884 h0.8
  text "AUX" at 70.47,12.73 h0.8 r90
  text "RX" at 70.479,10.679 h0.8 r90
  text "5V" at 8.128,9.415 h1.52
  text "TX" at 70.479,8.159 h0.8 r90
  text "A+" at 8.128,7.62 h1.52
  text "M1" at 70.479,5.788 h0.8 r90
  text "B-" at 8.128,5.461 h1.52
  text "GND" at 8.128,3.446 h1.52
  text "M0" at 70.47,2.691 h0.8 r90
Bottom Overlay:
  text "IO7" at 9.398,46.753 h1.52
  text "IO8" at 9.447,44.579 h1.52
  text "IO0" at 9.955,32.133 h1.52
  text "IO4" at 71.169,12.956 h1.52
  text "IO5" at 71.169,10.558 h1.52
  text "IO6" at 71.169,8.003 h1.52
  text "IO2" at 71.169,5.463 h1.52
  text "IO3" at 71.169,2.923 h1.52